# Altium PCB PCB_main_single_side_STACK.PcbDoc (part 1 of 2)
Units mm, origin at the board's own origin, x right, y up, seen from the top; angles counter-clockwise.
Board outline 58 x 37 mm, 2 copper layers (Top Layer, Bottom Layer), stack 1.571 mm thick; 67 components, 56 nets, 287 pads, 90 vias.
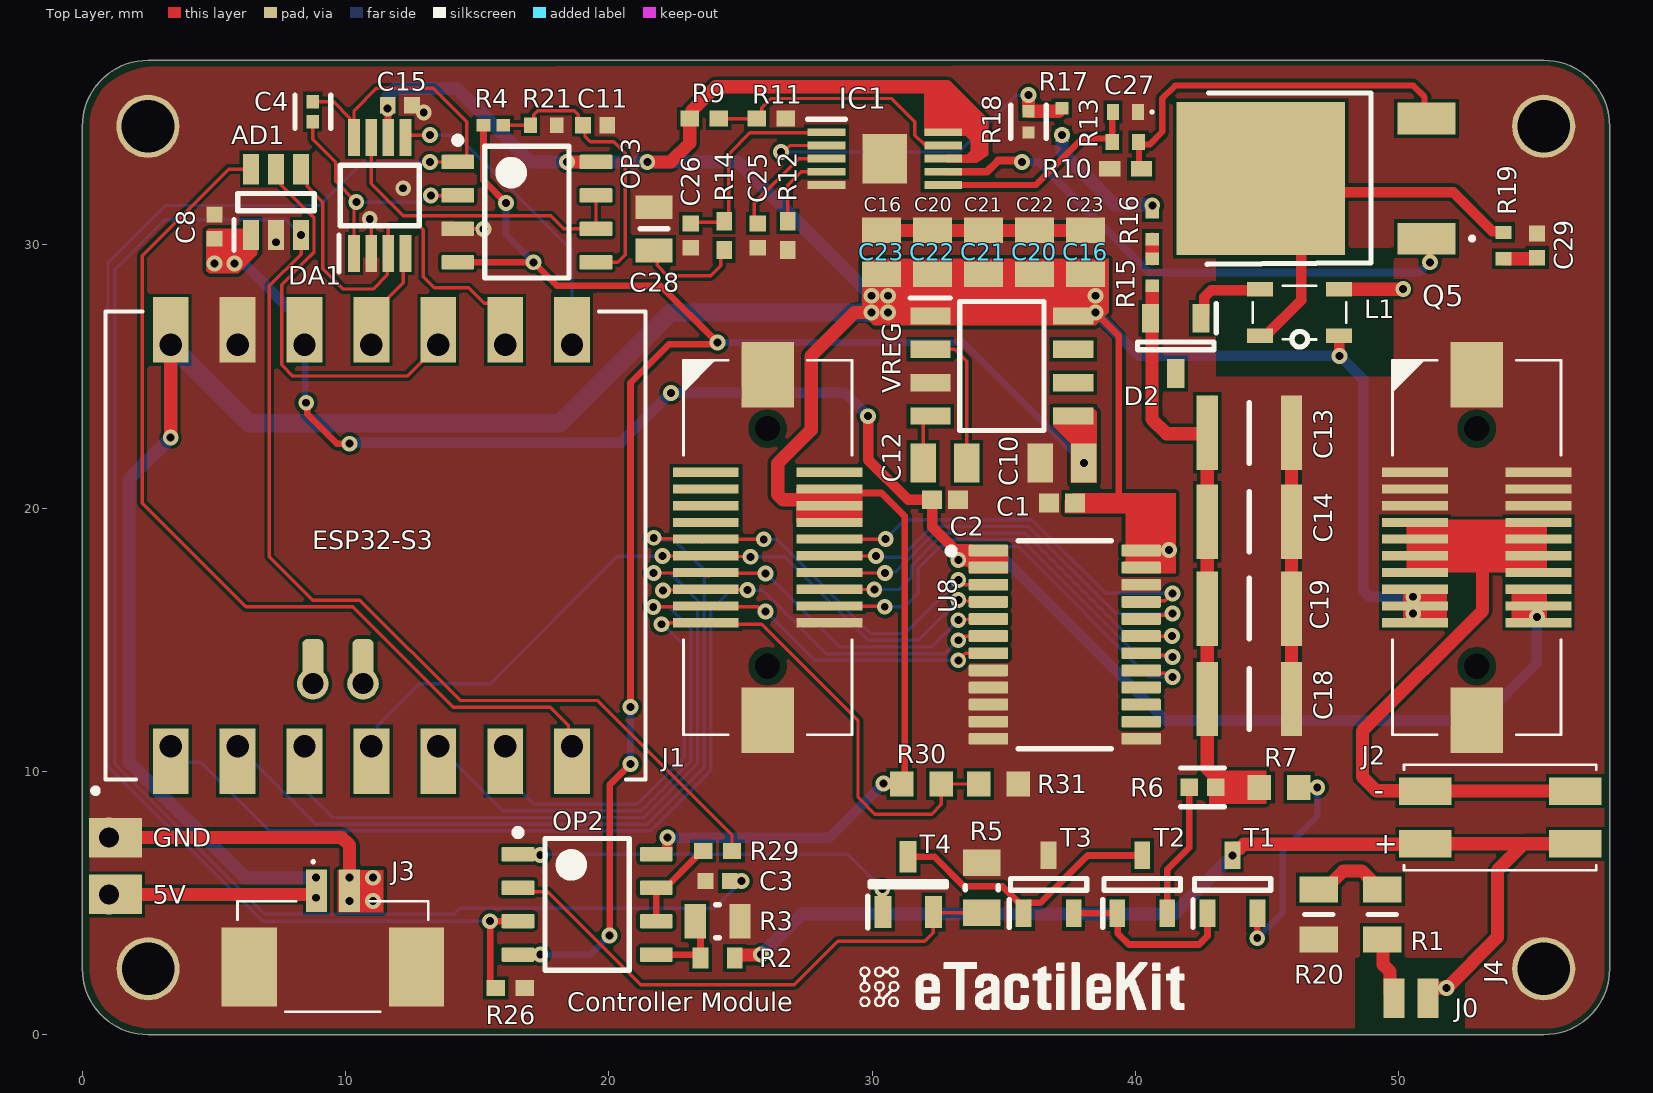
[diagram p0: Top Layer view]
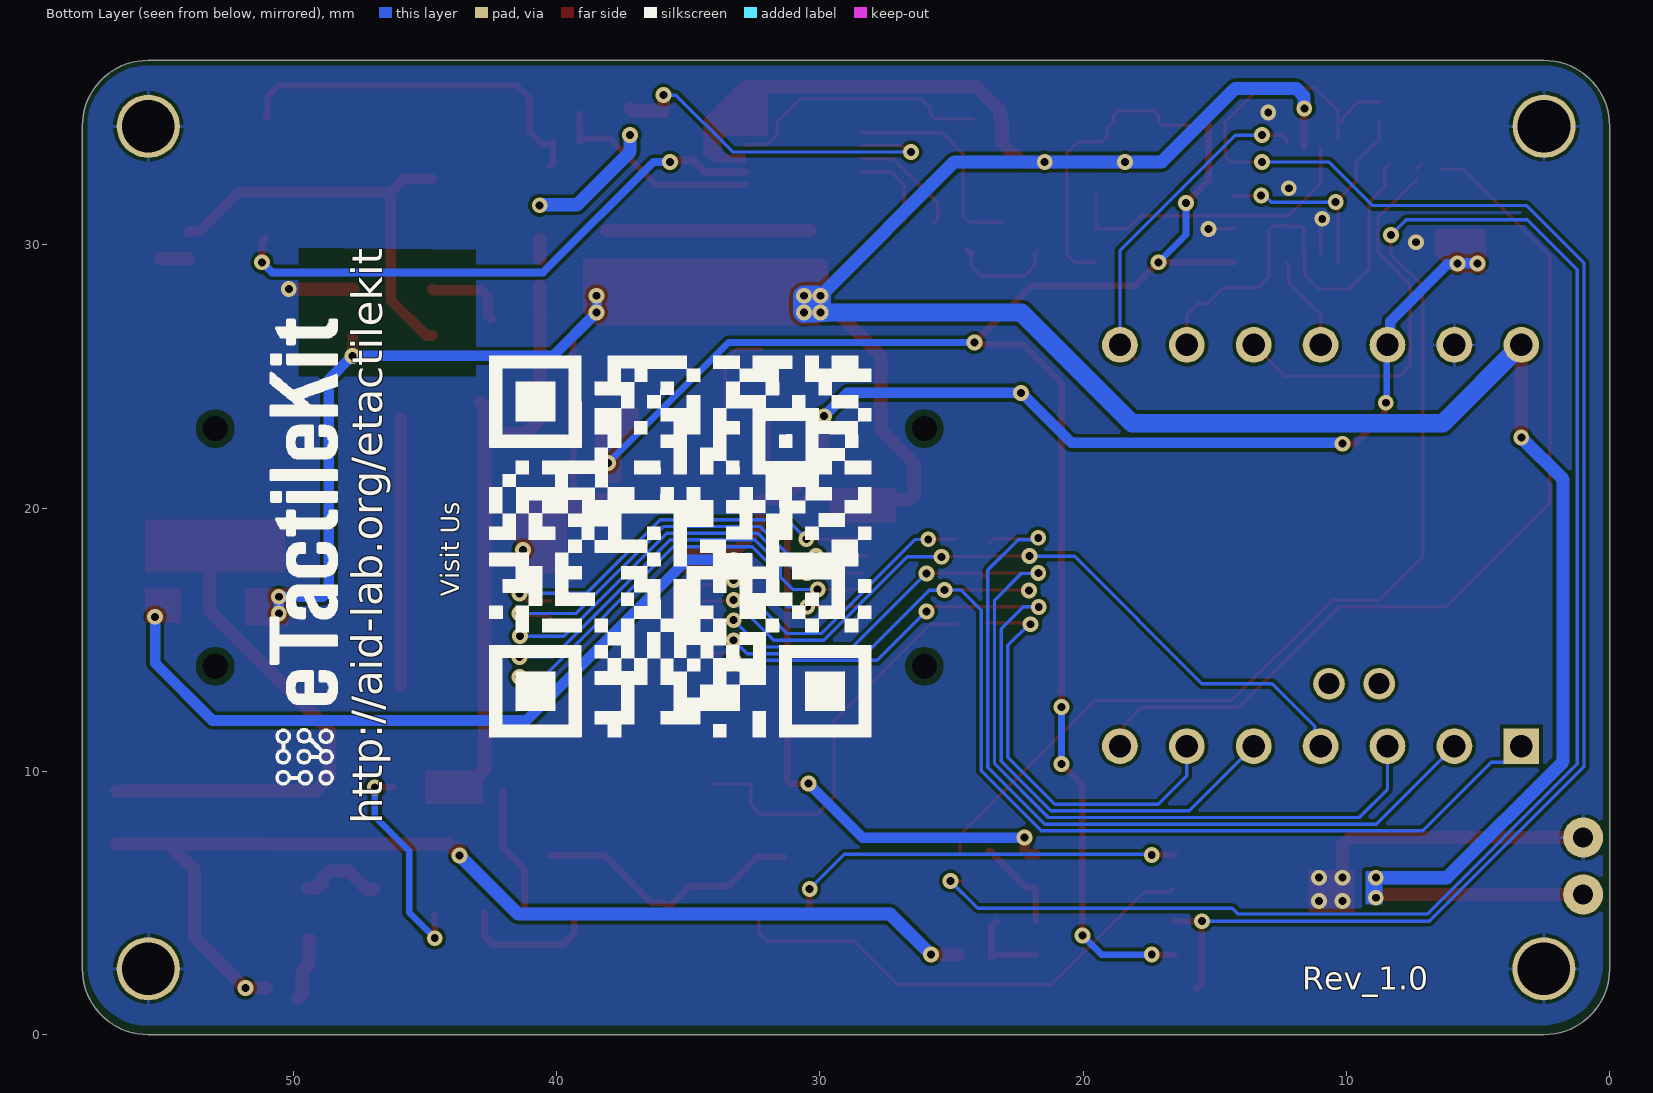
[diagram p1: Bottom Layer view, seen from below]

## Layer stack, top to bottom
Top Solder: solder mask 0.0102, Solder Resist, Dk 3.5
Top Layer: signal copper 0.0356
Dielectric 1: dielectric 1.5, FR-4, Dk 4.8
Bottom Layer: signal copper 0.0356
Bottom Solder: solder mask 0.0102, Solder Resist, Dk 3.5

## Board outline
0.008,2.508 0.008,34.508 cw(c2.508,34.508) 2.508,37.008 55.508,37.008 cw(c55.508,34.508) 58.008,34.508 58.008,2.508 cw(c55.508,2.508) 55.508,0.008 2.508,0.008 cw(c2.508,2.508)

## Design rules (kind name [scope] priority, off if disabled: settings)
BoardOutlineClearance [All] p1: gap=0.2 ignorepadtopadclearanceinfootprint=FALSE
Clearance [All] p1: gap=0.127 ignorepadtopadclearanceinfootprint=FALSE except(0.25: Arc-Hole Track-Hole SMDPad-Hole THPad-Hole Via-Hole Fill-Hole Poly-Hole Region-Hole Text-Hole)
ComponentClearance [All] p1: gap=0.127 collisioncheckmode=3 verticalgap=0.127 showdistances=TRUE
DiffPairsRouting [All] p1: maxlimit=0.254 minlimit=0.127 mostfreqgap=0.127 toplayer_minwidth=0.127 toplayer_maxwidth=25.4 toplayer_prefwidth=0.127 bottomlayer_minwidth=0.127 bottomlayer_maxwidth=25.4 bottomlayer_prefwidth=0.127 maxuncoupledlength=12.7
Height [All] p1: minheight=0 maxheight=1816.048 prefheight=12.7
HoleSize [All] p1: absolutevalues=TRUE maxlimit=6.3 minlimit=0.3 maxpercent=80.000 minpercent=20.000
HoleToHoleClearance [All] p1: gap=0.25 allowstackedmicrovias=FALSE
MinimumAnnularRing [All] p1: minimumring=0.076
MinimumSolderMaskSliver [All] p1: minsoldermaskwidth=0
PlaneClearance [All] p1: clearance=0.127
PlaneConnect PlaneConnectPowerPads [InPadClass('PowerPads')] p1: planeconnectstyle=Direct reliefexpansion=0.508 reliefentries=4 reliefconductorwidth=0.254 reliefairgap=0.254
PlaneConnect [All] p2: pad.planeconnectstyle=Relief pad.reliefexpansion=0.3 pad.reliefentries=4 pad.reliefconductorwidth=0.127 pad.reliefairgap=0.127 via.planeconnectstyle=Direct via.reliefexpansion=0.3 via.reliefentries=4 via.reliefconductorwidth=0.127 via.reliefairgap=0.127
PolygonConnect PolygonConnect_3 [All vs IsNamedPolygon('GND_L02_P007')] p1: connectstyle=Direct reliefconductorwidth=0.254 reliefentries=4 polygonreliefangle="90 Angle" airgapwidth=0.254
PolygonConnect PolygonConnect_2 [All vs IsNamedPolygon('GND_L02_P007')] p2: connectstyle=Direct reliefconductorwidth=0.254 reliefentries=4 polygonreliefangle="90 Angle" airgapwidth=0.254
PolygonConnect PolygonConnect_1 [All vs IsNamedPolygon('GND_L01_P000')] p3: connectstyle=Direct reliefconductorwidth=0.254 reliefentries=4 polygonreliefangle="90 Angle" airgapwidth=0.254
PolygonConnect PolygonConnectPowerPads [All vs (InPadClass('PowerPads'))] p4: connectstyle=Direct reliefconductorwidth=0.254 reliefentries=4 polygonreliefangle="90 Angle" airgapwidth=0.254
PolygonConnect [All] p5: thpad.connectstyle=Relief thpad.reliefconductorwidth=0.127 thpad.reliefentries=4 thpad.polygonreliefangle="90 Angle" thpad.airgapwidth=0.127 smdpad.connectstyle=Relief smdpad.reliefconductorwidth=0.127 smdpad.reliefentries=4 smdpad.polygonreliefangle="90 Angle" smdpad.airgapwidth=0.127 via.connectstyle=Direct via.reliefconductorwidth=0.127 via.reliefentries=4 via.polygonreliefangle="90 Angle" via.airgapwidth=0.127
RoutingVias [All] p1: holewidth=0.3 width=0.6 viastyle="Through Hole" minholewidth=0.3 minwidth=0.6 maxholewidth=0.6 maxwidth=6.6
SilkToSilkClearance [All] p1: silktosilkclearance=0
SilkToSolderMaskClearance [IsPad] p1: minsilkscreentomaskgap=0.127 clearancetoexposedcopper=TRUE
SolderMaskExpansion [All] p1: expansion=0.075 istentingtop=FALSE
SupplyNets "Schematic Supply Nets_4" [InNet('+5V')] p1: voltage=0.000
SupplyNets "Schematic Supply Nets_3" [InNet('-5')] p2: voltage=0.000
SupplyNets "Schematic Supply Nets_2" [InNet('+3V3')] p3: voltage=0.000
SupplyNets "Schematic Supply Nets" [InNet('GND')] p4: voltage=0.000
Width [All] p1: maxlimit=5 minlimit=0.127 preferedwidth=0.127 minimp=50.000000 maximp=50.000000 favimp=50.000000
20 further rules are at their usual default settings.

## Classes and differential pairs
component class vreg: C10 C12 C16 C20 C21 C22 C23 VREG
component class processor: C1 C2 ESP32-S3 J1 J2 J3 R30 R31 U8
component class DAC_ADC: AD1 C4 C8 C11 C15 DA1 OP3 R4 R21
component class current_mirror: C3 J0 J4 OP2 R1 R2 R3 R5 R6 R7 R20 R26 R29 T1 T2 T3 T4
component class boost_converter: C13 C14 C18 C19 C25 C26 C27 C28 C29 D2 IC1 L1 Q5 R9 R10 R11 R12 R13 R14 R15 R16 R17 R18 R19

## Components (designator, comment, footprint, x,y, rotation, side; value= is the part's Value field where it differs from the comment)
AD1 "AD7276AUJZ-REEL7" SOT95P280X100-6N 7.366,31.623 r90 top
C1 "CL05B104KO5NNNC" CAPC1050X55X23ML05T13 37.211,20.193 r180 top
C2 "CL05B104KO5NNNC" CAPC1050X55X23ML05T13 32.766,20.32 r180 top
C3 "GRM1555C1H102JA01D" CAPC1005X70N 24.13,5.842 r0 top
C4 "0402CG2R0C500NT" FP-GJM155-0_05-IPC_C 8.763,35.052 r270 top
C8 "CL05B104KO5NNNC" CAPC1005X55N 5.031,30.691 r270 top
C10 "GRM21BR61A476ME15L" CAPC2012X145N 37.211,21.717 r0 top
C11 "CL05B104KO5NNNC" CAPC1005X55N 19.479,34.544 r180 top
C12 "GRM21BR61A476ME15L" CAPC2012X145N 32.766,21.717 r0 top
C13 "C3225X7R2J683KT0L0U" CAPC3225X200N 44.323,22.86 r180 top
C14 "C3225X7R2J683KT0L0U" CAPC3225X200N 44.323,19.487 r180 top
C15 "CL05B104KO5NNNC" CAPC1005X55N 12.065,35.306 r180 top
C16 "GRM21BR61A476ME15L" CAPC2012X145N 38.1,29.718 r270 top
C18 "C3225X7R2J683KT0L0U" CAPC3225X200N 44.323,12.756 r180 top
C19 "C3225X7R2J683KT0L0U" CAPC3225X200N 44.323,16.185 r180 top
C20 "GRM21BR61A476ME15L" CAPC2012X145N 36.163,29.718 r270 top
C21 "GRM21BR61A476ME15L" CAPC2012X145N 34.227,29.718 r270 top
C22 "GRM21BR61A476ME15L" CAPC2012X145N 32.29,29.718 r270 top
C23 "GRM21BR61A476ME15L" CAPC2012X145N 30.353,29.718 r270 top
C25 "CL05B104KO5NNNC" CAPC1005X55N 25.654,30.353 r90 top
C26 "0402CG101J500NT" CAPC1005X55N 23.114,30.353 r90 top
C27 "GRM155R71H103KA88D" GRM15x 39.624,35.048 r180 top
C28 "CL21B223KBANNNC" CAPC2012X75N 21.717,30.607 r270 top
C29 "GRM1555C1H221JA01D" CAPC1005X70N 55.249,29.972 r270 top
D2 "LMBD3004SLT1G" SOT96P240X100-3N 41.529,26.162 r270 top
DA1 "AD5452YRMZ-REEL7" SOP65P490X110-8N 11.303,31.877 r90 top
ESP32-S3 "SEED XIAO ESP32-SE" PCBComponent_1 10.414,18.71 r90 top
IC1 "LT3757EMSE#TRPBF" SOP50P490X110-11N 30.48,33.274 r0 top
J0 "Saolder_bridge" "Solder Bridge" 50.516,1.397 r180 top
J1 "52885-0274" 528850274 26.035,18.508 r270 top
J2 "52885-0274" 528850274 52.959,18.508 r270 top
J3 "532610271" 532610271 9.525,3.175 r180 top
J4 "2307727-2" 2307727-2 53.848,8.255 r0 top
L1 "ATB322515" ATB322515 46.228,27.432 r0 top
OP2 "TL072IDR" D0008A_L 19.177,4.953 r0 top
OP3 "TL072IDR" D0008A_L 16.891,31.242 r0 top
Q5 "SQD40N06-14L_GE3" IPD25N06S4L30ATMA2 45.834,32.518 r90 top
R1 "0805W8F3302T5E" RESC2013X65N 49.373,4.572 r90 top
R2 "RC0603FR-071ML" RESC1608X55X25LL10T15 24.13,2.921 r0 top
R3 "CRCW08059K10FKEA" FP-CRCW0805-e3-IPC_C 24.13,4.318 r180 top
R4 "RC0402FR-0712KL" FP-RC0402-0_4-IPC_C 15.621,34.544 r180 top
R5 "CRCW08052K20FKEA" FP-CRCW0805-e3-IPC_B 34.163,5.588 r270 top
R6 "RMC1/16SK273FTH-M" FP-CRCW0402-e3-IPC_A 42.545,9.398 r0 top
R7 "0603WAF1001T5E" RESC1608X55N 45.454,9.398 r180 top
R9 "RK73H1ETTP1003F" RESC1005X40N 23.622,34.794 r180 top
R10 "WFCP0402R0200FE66" FP-PA0402-MFG 39.624,32.889 r0 top value=20mΩ
R11 "RK73H1ETTP4702F" RESC1005X40N 26.162,34.794 r180 top
R12 "RK73H1ETTP1303F" RESC1005X40N 26.797,30.353 r90 top
R13 "RC0402FR-0722RL" FP-RC0402-0_4-MFG 39.616,33.905 r180 top
R14 "RK73H1ETTP6801F" RESC1005X40N 24.384,30.353 r90 top
R15 "ERJU02F1004X" ERJS02_U02_(0402) 40.64,28.951 r270 top
R16 "ERJU02F1004X" ERJS02_U02_(0402) 40.64,30.734 r270 top
R17 "ERJU02F1004X" ERJS02_U02_(0402) 37.207,34.671 r270 top
R18 "CRCW040216K0FKED" FP-CRCW0402-e3-IPC_C 35.937,34.671 r90 top
R19 "RC0402FR-0722RL" FP-RC0402-0_4-MFG 53.979,29.972 r270 top
R20 "0805W8F3302T5E" RESC2013X65N 46.96,4.572 r270 top
R21 "HPCR0402F24K0K9" FP-RT0402-MFG 17.526,34.544 r180 top value=24KΩ
R26 "MCS04020C1002FE000" RESC1005X37N 16.256,1.778 r0 top
R29 "RK73H1ETTP1000F" RESC1005X40N 24.13,6.985 r0 top
R30 "RT0603BRD0740KL" RESC1608X55N 31.877,9.525 r180 top
R31 "0603WAF6042T5E" RESC1608X55N 34.798,9.525 r180 top
T1 "PBHV9050T-QR" SOT95P230X110-3N 43.688,5.715 r90 top
T2 "PBHV9050T-QR" SOT95P230X110-3N 40.259,5.715 r90 top
T3 "PBHV9050T-QR" SOT95P230X110-3N 36.703,5.715 r90 top
T4 "DMN60H080DS-13" SOT96P240X110-3N 31.369,5.715 r90 top
U8 "SN74LVC8T245PWR" FP-PW0024A-MFG 37.317,14.818 r0 top
VREG "LTC1144IS8#PBF" SOIC127P599X175-8N 34.925,25.4 r0 top

## Footprints (in the part's own frame and the unit in brackets; to place one, negate y for a bottom-side part, rotate by r counter-clockwise, add the part's x,y. Pads: shape width x height; smd on the part's side, far side on the other; paste and mask are expansions set on the pad)
2307727-2 [mm]
  rect 2x1.05 smd: 1(2.85,1) 2(2.85,-1) MP1(-2.85,1) MP2(-2.85,-1)
  silkscreen extent -3.65,-2 3.65,2, body extent -3.65,-2 3.65,2, height 2.07
528850274 [mm]
  rect 0.35x2.5 smd: 1(-2.857,-2.35) 2(-2.857,2.35) 3(-2.223,-2.35) 4(-2.223,2.35) 5(-1.587,-2.35) 6(-1.587,2.35) 7(-0.952,-2.35) 8(-0.952,2.35) 9(-0.317,-2.35) 10(-0.317,2.35) 11(0.317,-2.35) 12(0.317,2.35) 13(0.953,-2.35) 14(0.953,2.35) 15(1.588,-2.35) 16(1.588,2.35) 17(2.223,-2.35) 18(2.223,2.35) 19(2.857,-2.35) 20(2.857,2.35)
  rect 2.5x2 smd: 21(-6.56,0) 22(6.56,0)
  round 0.475 hole 0.95 unplated: 23(-4.51,0) 24(4.51,0)
  silkscreen extent -7.11,-3.2 7.11,3.2, body extent -7.11,-3.2 7.11,3.2, height 4.2
532610271 [mm]
  rect 0.8x1.6 smd: 1(0.625,-2.3) 2(-0.625,-2.3)
  rect 2.1x3 smd: MP1(3.175,0.6) MP2(-3.175,0.6)
  silkscreen extent -3.62,-3.45 3.62,2.3, body extent -3.83,-2.54 3.83,2.66, height 3.4
ATB322515 [mm]
  rect 1x0.55 smd: 1(-1.5,-0.875) 2(-1.5,0.875) 3(1.5,0.875) 4(1.5,-0.875)
  body extent -1.78,-1.02 1.78,1.02, height 1.21
CAPC1005X55N [mm]
  rect 0.6x0.62 smd: 1(-0.46,0) 2(0.46,0)
  body extent -0.5,-0.25 0.5,0.25, height 0.55
CAPC1005X70N [mm]
  rect 0.6x0.62 smd: 1(-0.46,0) 2(0.46,0)
  body extent -0.5,-0.25 0.5,0.25, height 0.5
CAPC1050X55X23ML05T13 [mm] "Chip Capacitor, 2-Leads, Body 1.05x0.55mm, IPC Low Density"
  rect 0.76x0.72 smd: 1(-0.49,0) 2(0.49,0)
  body extent -0.53,-0.28 0.53,0.27, height 0.55
CAPC2012X75N [mm]
  rect 0.91x1.39 smd: 1(-0.82,0) 2(0.82,0)
  silkscreen extent 0,-0.53 0,0.53, body extent -1,-0.63 1,0.63, height 0.75
CAPC2012X145N [mm]
  rect 0.97x1.47 smd: 1(-0.83,0) 2(0.83,0)
  body extent -1,-0.63 1,0.63, height 1.45
CAPC3225X200N [mm]
  rect 0.81x2.82 smd: 1(-1.6,0) 2(1.6,0)
  silkscreen extent 0,-1.15 0,1.15, body extent -1.6,-1.25 1.6,1.25, height 2.5
D0008A_L [mm] "SOIC, 8-Leads, Body 5x4mm, Pitch 1.27mm, IPC High Density"
  rrect18% 1.25x0.55 smd: 1(-2.625,1.905) 2(-2.625,0.635) 3(-2.625,-0.635) 4(-2.625,-1.905) 5(2.625,-1.905) 6(2.625,-0.635) 7(2.625,0.635) 8(2.625,1.905)
  silkscreen extent -2.75,-2.5 1.6,2.85, body extent -3,-2.45 3,2.45, height 1.63
ERJS02_U02_(0402) [mm]
  rect 0.475x0.5 smd: 1(-0.513,0) 2(0.513,0)
  body extent -0.5,-0.25 0.5,0.25, height 0.35
FP-CRCW0402-e3-IPC_A [mm]
  rect 0.668x0.672 smd paste+0 mask+0: 1(-0.502,0) 2(0.502,0)
  silkscreen extent -0.84,-0.74 0.84,0.74, body extent -1.04,-0.54 1.04,0.54, height 0.25
FP-CRCW0402-e3-IPC_C [mm]
  rect 0.468x0.472 smd paste+0 mask+0: 1(-0.402,0) 2(0.402,0)
  silkscreen extent -0.64,-0.67 0.64,0.67, body extent -0.5,-0.25 0.5,0.25, height 0.4
FP-CRCW0805-e3-IPC_B [mm]
  rect 1.007x1.408 smd paste+0 mask+0: 1(-0.951,0) 2(0.951,0)
  silkscreen extent -0.07,-0.63 0.07,0.63, body extent -1.7,-0.95 1.7,0.95, height 0.25
FP-CRCW0805-e3-IPC_C [mil]
  rect 31.75x51.5 smd paste+0 mask+0: 1(-33.5,0) 2(33.5,0)
  silkscreen extent -3,-25 3,25, body extent -53,-31 53,31, height 10
FP-GJM155-0_05-IPC_C [mm]
  rect 0.515x0.472 smd paste+0 mask+0: 1(-0.379,0) 2(0.379,0)
  silkscreen extent -0.64,-0.67 0.64,0.67, body extent -0.74,-0.38 0.74,0.38, height 0.25
FP-PA0402-MFG [mm]
  rect 0.8x0.6 smd paste+0 mask+0: 1(-0.6,0) 2(0.6,0)
  body extent -0.5,-0.28 0.5,0.28, height 0.4
FP-PW0024A-MFG [mm]
  rrect22% 1.5x0.45 smd paste+0 mask+0: 1(-2.9,3.575) 2(-2.9,2.925) 3(-2.9,2.275) 4(-2.9,1.625) 5(-2.9,0.975) 6(-2.9,0.325) 7(-2.9,-0.325) 8(-2.9,-0.975) 9(-2.9,-1.625) 10(-2.9,-2.275) 11(-2.9,-2.925) 12(-2.9,-3.575) 13(2.9,-3.575) 14(2.9,-2.925) 15(2.9,-2.275) 16(2.9,-1.625) 17(2.9,-0.975) 18(2.9,-0.325) 19(2.9,0.325) 20(2.9,0.975) 21(2.9,1.625) 22(2.9,2.275) 23(2.9,2.925) 24(2.9,3.575)
  silkscreen extent -4.44,-3.95 1.78,3.95, body extent -3.2,-3.9 3.2,3.9, height 1.2
FP-RC0402-0_4-IPC_C [mm]
  rect 0.515x0.472 smd paste+0 mask+0: 1(-0.379,0) 2(0.379,0)
  body extent -0.74,-0.38 0.74,0.38, height 0.25
FP-RC0402-0_4-MFG [mm]
  rect 0.5x0.6 smd: 1(-0.5,0) 2(0.5,0)
  body extent -0.5,-0.25 0.5,0.25, height 0.4
FP-RT0402-MFG [mm]
  rect 0.5x0.6 smd paste+0 mask+0: 1(-0.5,0) 2(0.5,0)
  body extent -0.85,-0.4 0.85,0.4, height 0.25
GRM15x [mm]
  rect 0.45x0.6 smd: 1(-0.475,0) 2(0.475,0)
  silkscreen extent -1.05,-0.05 -0.95,0.05, body extent -0.5,-0.28 0.5,0.27, height 0.5
IPD25N06S4L30ATMA2 [mm]
  rect 1.2x2.2 smd: 1(-2.28,-5.22) 3(2.28,-5.22)
  rect 5.8x6.4 smd: 2(0,1.08)
  silkscreen extent -3.25,-7 3.25,3.11, body extent -3.3,-5.87 3.3,3.83, height 2.4
PCBComponent_1 [mil]
  rect 98.43x53.46 smd: 1(-327.48,277.5) 2(-327.48,177.5) 3(-327.48,77.5) 4(-327.48,-22.5) 5(-327.48,-122.5) 6(-327.48,-222.5) 7(-327.48,-322.5) 8(317.48,-322.5) 9(317.48,-222.5) 10(317.48,-122.5) 11(317.48,-22.5) 12(317.48,77.5) 13(317.48,177.5) 14(317.48,277.5)
  rect 53.46x53.46 hole 33.46: 1(-305,277.5)
  round 53.46 hole 33.46: 2(-305,177.5) 3(-305,77.5) 4(-305,-22.5) 5(-305,-122.5) 6(-305,-222.5) 7(-305,-322.5) 8(295,-322.5) 9(295,-222.5) 10(295,-122.5) 11(295,-22.5) 12(295,77.5) 13(295,177.5) 14(295,277.5)
  rrect50% 70.87x31.5 smd: 15(-180,-10) 16(-180,65)
  silkscreen extent -376,-432 345,394, body extent -355,-434 345,450, height 166
RESC1005X37N [mm]
  rect 0.7x0.6 smd: 1(-0.55,0) 2(0.55,0)
  body extent -0.5,-0.25 0.5,0.25, height 0.32
RESC1005X40N [mm]
  rect 0.7x0.6 smd: 1(-0.55,0) 2(0.55,0)
  body extent -0.51,-0.25 0.51,0.25, height 0.4
RESC1608X55N [mm]
  rect 0.9x0.95 smd: 1(-0.75,0) 2(0.75,0)
  body extent -0.8,-0.4 0.8,0.4, height 0.55
RESC1608X55X25LL10T15 [mm] "Chip Resistor, 2-Leads, Body 1.70x0.90mm, IPC High Density"
  rect 0.6x0.8 smd: 1(-0.65,0) 2(0.65,0)
  body extent -0.85,-0.45 0.85,0.45, height 0.55
RESC2013X65N [mm]
  rect 1x1.45 smd: 1(-0.95,0) 2(0.95,0)
  silkscreen extent 0,-0.54 0,0.54, body extent -1,-0.64 1,0.64, height 0.65
SOIC127P599X175-8N [mm]
  rect 1.526x0.65 smd: 1(-2.712,1.905) 2(-2.712,0.635) 3(-2.712,-0.635) 4(-2.712,-1.905) 5(2.712,-1.905) 6(2.712,-0.635) 7(2.712,0.635) 8(2.712,1.905)
  silkscreen extent -3.47,-2.45 1.6,2.58, body extent -3,-2.45 3,2.45, height 1.75
"Solder Bridge" [mm]
  rect 0.8x1.5 smd: 1(-0.6,0) 2(0.7,0)
SOP50P490X110-11N [mm]
  rect 1.425x0.3 smd: 1(-2.212,1) 2(-2.212,0.5) 3(-2.212,0) 4(-2.212,-0.5) 5(-2.212,-1) 6(2.212,-1) 7(2.212,-0.5) 8(2.212,0) 9(2.212,0.5) 10(2.212,1)
  rect 1.68x1.88 smd: 11(0,0)
  silkscreen extent -2.93,1.5 -1.5,1.5, body extent -2.45,-1.5 2.45,1.5, height 1.1
SOP65P490X110-8N [mm]
  rect 1.4x0.45 smd: 1(-2.2,0.975) 2(-2.2,0.325) 3(-2.2,-0.325) 4(-2.2,-0.975) 5(2.2,-0.975) 6(2.2,-0.325) 7(2.2,0.325) 8(2.2,0.975)
  silkscreen extent -2.9,-1.5 1.15,1.55, body extent -2.45,-1.5 2.45,1.5, height 1.1
SOT95P230X110-3N [mm]
  rect 1.05x0.6 smd: 1(-1.1,0.95) 2(-1.1,-0.95) 3(1.1,0)
  silkscreen extent -1.63,-1.45 0.23,1.5, body extent -1.2,-1.45 1.2,1.45, height 0.95
SOT95P280X100-6N [mm]
  rect 1.15x0.6 smd: 1(-1.25,0.95) 2(-1.25,0) 3(-1.25,-0.95) 4(1.25,-0.95) 5(1.25,0) 6(1.25,0.95)
  silkscreen extent -1.83,-1.45 0.33,1.6, body extent -1.4,-1.45 1.4,1.45, height 1
SOT96P240X100-3N [mm]
  rect 1.1x0.65 smd: 1(-1.05,0.96) 2(-1.05,-0.96) 3(1.05,0)
  silkscreen extent -1.6,-1.45 0.15,1.54, body extent -1.2,-1.45 1.2,1.45, height 1
SOT96P240X110-3N [mm]
  rect 1.2x0.65 smd: 1(-1.05,0.96) 2(-1.05,-0.96) 3(1.05,0)
  silkscreen extent -1.65,-1.45 0.1,1.54, body extent -1.33,-1.5 1.33,1.5, height 1.1

## Part data
AD1: "Integrated Circuit", Manufacturer_Name="Analog Devices", Mouser Part Number=584-AD7276AUJZ-R7, Arrow Part Number=AD7276AUJZ-REEL7, Arrow Price/Stock=https://www.arrow.com/en/products/ad7276aujz-reel7/analog-devices, Datasheet Link=http://componentsearchengine.com/Datasheets/1/AD7276AUJZ-REEL7.pdf, Height=1mm, Manufacturer_Part_Number=AD7276AUJZ-REEL7, Mouser Price/Stock=https://www.mouser.co.uk/ProductDetail/Analog-Devices/AD7276AUJZ-REEL7?qs=NmRFExCfTkGcJMyUALbIIQ%3D%3D
C1 C2: library part CMP-2000-05439-1, "Chip Capacitor, 100 nF, +/- 10%, 16 V, -55 to 125 degC, 0402 (1005 Metric), RoHS, Tape and Reel", Capacitance=100000pF, Case Size/Dimension=0402, Dielectric=X7R, Manufacturer="Samsung Electro-Mechanics", Rated Voltage=16V, Tolerance (%)=±10%, Datasheet URL=https://datasheet.ciiva.com/29198/458718-da-01-en-vs-kondensator-0402-29198423.pdf, Datasheet Version=Nov-10, Manufacturer URL=http://www.samsungsem.com/global/index.jsp
C3: library part GRM1552C1H102JA01D, "1nF 50V 5% C0G 0402 ceramic capacitor", LCSC Part Number=C76947, Manufacturer_Name="Murata Electronics", Mouser Part Number=N/A, Datasheet Link=https://datasheet.lcsc.com/datasheet/pdf/dcf17139cd724f8e8706553836b517d8.pdf?productCode=C76947, Height=0.55mm, Manufacturer_Part_Number=GRM1555C1H102JA01D
C4: library part CMP-2008-03830-2, "Multi-Layer Ceramic Capacitor 2pF C0G  ±0.1pF 0402 Paper T/R", Capacitance=2pF, Case Code (Imperial)=0402, Case Code (Metric)=1005, Dielectric=C0G, Max Operating Temperature=125°C, Min Operating Temperature=-55°C, Package Quantity=1, Voltage Rating=50V, Case/Package=0402, Depth=0.5mm, Height=0.5mm, Lead Free="Lead Free", Lead Pitch=0.3mm, Length=1mm, Mount="Surface Mount", Number of Pins=2, Packaging="Tape and Reel", Radiation Hardening=No, REACH SVHC="No SVHC", Termination=SMD/SMT, Thickness=0.022inch, Voltage Rating (DC)=50V, Width=0.5mm
C8 C11 C15 C25: "Capacitor", Manufacturer_Name=SAMSUNG, Mouser Part Number=187-CL05B104KO5NNNC, Arrow Part Number=CL05B104KO5NNNC, Arrow Price/Stock=https://www.arrow.com/en/products/cl05b104ko5nnnc/samsung-electro-mechanics?utm_currency=USD&region=europe, Datasheet Link=https://datasheet.datasheetarchive.com/originals/distributors/Datasheets-DGA10/2408147.pdf, Height=0.55mm, Manufacturer_Part_Number=CL05B104KO5NNNC, Mouser Price/Stock=https://www.mouser.co.uk/ProductDetail/Samsung-Electro-Mechanics/CL05B104KO5NNNC?qs=hqM3L16%252BxlfT2SKOuAUq6Q%3D%3D
C10 C12 C16 C20 C21 C22 C23: "Capacitor", Manufacturer_Name="Murata Electronics", Mouser Part Number=81-GRM21BR61A476ME5L, Arrow Part Number=GRM21BR61A476ME15L, Arrow Price/Stock=https://www.arrow.com/en/products/grm21br61a476me15l/murata-manufacturing?utm_currency=USD&region=nac, Datasheet Link=https://search.murata.co.jp/Ceramy/image/img/A01X/G101/ENG/GRM21BR61A476ME15-01A.pdf, Height=1.45mm, Manufacturer_Part_Number=GRM21BR61A476ME15L, Mouser Price/Stock=https://www.mouser.co.uk/ProductDetail/Murata-Electronics/GRM21BR61A476ME15L?qs=hNud%2FORuBR2%2FEB7WUpdltg%3D%3D
C13 C14 C18 C19: library part C3225X7R2J683K200AA, "Capacitor", Manufacturer_Name=TDK, Mouser Part Number=810-C3225X7R2J683K, Arrow Part Number=C3225X7R2J683K200AA, Arrow Price/Stock=https://www.arrow.com/en/products/c3225x7r2j683k200aa/tdk?region=nac, Datasheet Link=https://product.tdk.com/info/en/catalog/datasheets/mlcc_commercial_midvoltage_en.pdf, Height=2mm, Manufacturer_Part_Number=C3225X7R2J683K200AA, Mouser Price/Stock=https://www.mouser.com/Search/Refine.aspx?Keyword=810-C3225X7R2J683K
C26: "Capacitor", Manufacturer_Name="Guangdong Fenghua Advanced Tech", Datasheet Link=https://datasheet.lcsc.com/szlcsc/Guangdong-Fenghua-Advanced-Tech-0402CG101J500NT_C1546.pdf, Height=0.55mm, Manufacturer_Part_Number=0402CG101J500NT
C27: "Capacitor", Manufacturer_Name="Murata Electronics", Mouser Part Number=81-GRM155R71H103KA8D, Arrow Part Number=GRM155R71H103KA88D, Arrow Price/Stock=https://www.arrow.com/en/products/grm155r71h103ka88d/murata-manufacturing?utm_currency=USD&region=nac, Datasheet Link=https://search.murata.co.jp/Ceramy/image/img/A01X/G101/ENG/GRM155R71H103KA88-01A.pdf, Height=0.33mm, Manufacturer_Part_Number=GRM155R71H103KA88D, Mouser Price/Stock=https://www.mouser.co.uk/ProductDetail/Murata-Electronics/GRM155R71H103KA88D?qs=Dfh4SrgScWxOVlCuzd3ZyQ%3D%3D
C28: "Capacitor", Manufacturer_Name=SAMSUNG, Mouser Part Number=187-CL21B223KBANNNC, Arrow Part Number=CL21B223KBANNNC, Arrow Price/Stock=https://www.arrow.com/en/products/cl21b223kbannnc/samsung-electro-mechanics?utm_currency=USD&region=europe, Datasheet Link=https://datasheet.datasheetarchive.com/originals/distributors/Datasheets_SAMA/f1186cf82a02fbe5c02a084f1b7bc7a5.pdf, Height=0.75mm, Manufacturer_Part_Number=CL21B223KBANNNC, Mouser Price/Stock=https://www.mouser.co.uk/ProductDetail/Samsung-Electro-Mechanics/CL21B223KBANNNC?qs=349EhDEZ59o8NyW%2FjkRQDg%3D%3D
C29: "Capacitor", Manufacturer_Name="Murata Electronics", Mouser Part Number=81-GRM1555C1H221JA01, Arrow Part Number=GRM1555C1H221JA01D, Arrow Price/Stock=https://www.arrow.com/en/products/grm1555c1h221ja01d/murata-manufacturing, Datasheet Link=https://search.murata.co.jp/Ceramy/image/img/A01X/G101/ENG/GRM1555C1H221JA01-01A.pdf, Height=0.7mm, Manufacturer_Part_Number=GRM1555C1H221JA01D, Mouser Price/Stock=https://www.mouser.co.uk/ProductDetail/Murata-Electronics/GRM1555C1H221JA01D?qs=AflYu6BMgmkFaPorbrBIOQ%3D%3D
D2: library part MMBD3004S-7-F, "Diode", Arrow Part Number=N/A, LCSC Part Number=C2912025, Manufacturer_Name=LRC, Datasheet Link=https://datasheet.lcsc.com/datasheet/pdf/fb38fe26aa71a7d6338775a41d6a7480.pdf?productCode=C2912025, Height=1mm, JLCPCB URL=https://jlcpcb.com/partdetail/LRC-LMBD3004SLT1G/C2912025, Manufacturer_Part_Number=LMBD3004SLT1G
DA1: "Integrated Circuit", Manufacturer_Name="Analog Devices", Mouser Part Number=584-AD5452YRMZ-R7, Arrow Part Number=AD5452YRMZ-REEL7, Arrow Price/Stock=https://www.arrow.com/en/products/ad5452yrmz-reel7/analog-devices?region=nac, Datasheet Link=https://componentsearchengine.com/Datasheets/1/AD5452YRMZ-REEL7.pdf, Height=1.1mm, Manufacturer_Part_Number=AD5452YRMZ-REEL7, Mouser Price/Stock=https://www.mouser.co.uk/ProductDetail/Analog-Devices/AD5452YRMZ-REEL7?qs=NmRFExCfTkHoityukWLALQ%3D%3D
ESP32-S3 J0: library part Component_1
IC1: library part LT3757EMSETRPBF, "Integrated Circuit", Manufacturer_Name="Analog Devices", Height=1.1mm, Manufacturer_Part_Number=LT3757EMSETRPBF
J1 J2: "Connector", Manufacturer_Name=Molex, Mouser Part Number=538-52885-0274, Datasheet Link=https://www.molex.com/webdocs/datasheets/pdf/en-us/0528850274_PCB_RECEPTACLES.pdf, Height=4mm, Manufacturer_Part_Number=52885-0274, Mouser Price/Stock=https://www.mouser.co.uk/ProductDetail/Molex/52885-0274?qs=%252BPJ3Ll1xQNYiQig4hWY5jQ%3D%3D
J3: library part 53261-0271, "C177225", Manufacturer_Name=Molex, Mouser Part Number=538-53261-0271, Arrow Part Number=53261-0271, Arrow Price/Stock=https://www.arrow.com/en/products/53261-0271/molex?region=nac, Datasheet Link=https://www.molex.com/pdm_docs/sd/532610271_sd.pdf, Height=3.65mm, Manufacturer_Part_Number=53261-0271, Mouser Price/Stock=https://www.mouser.co.uk/ProductDetail/Molex/53261-0271?qs=%252B72YyncTwW%252B8%252BBjraxGf3A%3D%3D
J4: "Connector"
OP2 OP3: library part CMP-0015-00084-2, "Dual Low-Noise JFET-Input General-Purpose Operational Amplifier, 7 to 36 V, -40 to 85 degC, 8-pin SOIC (D8), Green (RoHS & no Sb/Br)", Manufacturer="Texas Instruments", Rating=Catalog, Total Supply Voltage(Max)(+5V is 5, +/-5V is 10)=36, Total Supply Voltage(Min)(+5V is 5, +/-5V is 10)=7, CMRR(Min)(dB)=75, Code_JEDEC=MS-012, ComponentLink1Description="Manufacturer URL", ComponentLink1URL=http://www.ti.com/, ComponentLink2Description=Datasheet, ComponentLink2URL=http://www.ti.com/lit/ds/symlink/tl072.pdf, ComponentLink3Description="Package Specification", ComponentLink3URL=http://www.ti.com/litv/pdf/msoi002j, DatasheetVersion=SLOS080J, Eco-Plan="Green (RoHS & no Sb/Br)", GBW(Typ)(MHz)=3, IIB(Max)(pA)=200, Iq per channel(Max)(mA)=2.5, Mounting Technology="Surface Mount", Number of Channels=2, Offset Drift(Typ)(uV/C)=18, PackageDescription="8-Pin Plastic Small Outline, Body 4.9 x 3.9 mm, Pitch 1.27 mm", PackageReference=D0008A, PackageVersion="4040047-3/M, 06/2011", PartNumber=TL072IDR, Slew Rate(Typ)(V/us)=13, Sub Family="General Purpose Amplifier, High Supply Voltage Amplifier (>=30V)", Vio (25C)(Max)(mV)=6, Vn at 1kHz(Typ)(nV/rtHz)=18
Q5: library part IPD25N06S4L30ATMA2, "60V 40A N-channel MOSFET, 17mOhm max at VGS=4.5V, TO-252", Arrow Part Number=N/A, LCSC Part Number=C3291003, Manufacturer_Name="Vishay Siliconix", Datasheet Link=https://www.vishay.com/docs/67002/sqd40n06-14l.pdf, Height=2.38mm, JLCPCB URL=https://jlcpcb.com/partdetail/VishayIntertech-SQD40N0614L_GE3/C3291003, Manufacturer_Part_Number=SQD40N06-14L_GE3
R1 R7 R20: "Resistor", Manufacturer_Name="UNI-ROYAL(Uniroyal Elec)"
  R1 R20: Datasheet Link=https://datasheet.lcsc.com/lcsc/2110251830_UNI-ROYAL-Uniroyal-Elec-0805W8F3302T5E_C17633.pdf, Height=0.65mm, Manufacturer_Part_Number=0805W8F3302T5E
  R7: Datasheet Link=https://datasheet.lcsc.com/szlcsc/Uniroyal-Elec-0603WAF1001T5E_C21190.pdf, Height=0.55mm, Manufacturer_Part_Number=0603WAF1001T5E
R2: library part CMP-1659-00056-1, "Chip Resistor, 1 MOhm, +/- 1%, 100 mW, -55 to 155 degC, 0603 (1608 Metric), RoHS, Tape and Reel", Capacitance="1 mF", Case\Package=Radial, Max Operating Temperature="85 degC", Min Operating Temperature="-40 degC", Package Quantity=200, Tolerance=20%, Voltage Rating="25 V", ComponentLink1Description="Manufacturer URL", ComponentLink1URL=http://www.yageo.com/, ComponentLink2Description=Datasheet, ComponentLink2URL=http://www.yageo.com/documents/recent/PYu-RC_Group_51_RoHS_L_04.pdf, DatasheetVersion="Rev. 4, 02/2016", Diameter="10 mm", Height="20 mm", Lead Pitch="5 mm", Length="20 mm", Mount="Through Hole", PackageDescription="2-Pin Surface Mount Device, Body 1.6 x 0.8 mm", PackageReference=0603, Packaging=Bulk, Radiation Hardening=No, REACH SVHC="No SVHC", RoHSCompliant=true, Voltage Rating (DC)="25 V", Width="0 inch"
R3: library part CMP-2001-04176-2, "RES Thick Film, 9.1kΩ, 1%, 0.125W, 100ppm/°C, 0805", Case Code (Imperial)=0805, Case Code (Metric)=2012, Max Operating Temperature=155°C, Max Power Dissipation=125mW, Min Operating Temperature=-55°C, Package Quantity=10, Resistance=9.1kR, Temperature Coefficient=100ppm/°C, Tolerance=1%, Voltage Rating=150V, Case/Package=0805, Composition="Thick Film", Contact Plating=Tin, Depth=1.25mm, Features="Automotive AEC-Q200", Height=0.45mm, Lead Free="Lead Free", Length=2mm, Military Standard=Not, Number of Terminations=2, Packaging="Tape and Reel", Power Rating=125mW, Radiation Hardening=No, Termination=SMD/SMT, Voltage Rating (DC)=150V, Weight=0.000194oz, Width=0.049inch
R4: library part CMP-2002-07378-2, "RES SMD 12K OHM 1% 1/16W 0402", Case Code (Imperial)=0402, Case Code (Metric)=1005, Max Operating Temperature=155°C, Max Power Dissipation=63mW, Min Operating Temperature=-55°C, Package Quantity=1, Power Rating=62.5mW, Resistance=12kR, Resistance Tolerance=1%, Resistor Type="Thick Film", Temperature Coefficient=100ppm/°C, Voltage Rating=50V, Case/Package=0402, Construction=Rectangular, Depth=0.5mm, Features="Moisture Resistant", Height=0.016inch, Lead Free="Lead Free", Length=1mm, Military Standard=Not, Number of Terminations=2, Packaging="Tape and Reel", REACH SVHC="No SVHC", RoHS Compliant=Yes, Series=RC, Size Code=0402, Termination=SMD/SMT, Tolerance=1%, Weight=2.3E-05oz, Width=0.02inch
R5: library part CMP-2001-03760-2, "RES Thick Film, 2.2kΩ, 1%, 0.125W, 100ppm/°C, 0805", Case Code (Imperial)=0805, Case Code (Metric)=2012, Max Operating Temperature=155°C, Max Power Dissipation=125mW, Min Operating Temperature=-55°C, Package Quantity=10, Resistance=2.2kR, Temperature Coefficient=100ppm/°C, Tolerance=1%, Voltage Rating=150V, Case/Package=0805, Composition="Thick Film", Contact Plating=Tin, Depth=1.25mm, Features="Automotive AEC-Q200", Height=0.45mm, Lead Free="Lead Free", Length=2mm, Military Standard=Not, Number of Terminations=2, Packaging="Tape and Reel", Power Rating=125mW, Radiation Hardening=No, Termination=SMD/SMT, Voltage Rating (DC)=150V, Weight=0.000194oz, Width=1.25mm
R6: library part CMP-2002-08431-2, "RES Thick Film, 27kΩ, 1%, 0.063W, 100ppm/°C, 0402", Case Code (Imperial)=0402, Case Code (Metric)=1005, Max Operating Temperature=155°C, Max Power Dissipation=63mW, Min Operating Temperature=-55°C, Package Quantity=10, Resistance=27kR, Temperature Coefficient=100ppm/°C, Tolerance=1%, Voltage Rating=50V, Case/Package=0402, Composition="Thick Film", Contact Plating=Tin, Depth=0.5mm, Features="Automotive AEC-Q200", Height=0.35mm, Lead Free="Lead Free", Length=1mm, Military Standard=Not, Mount="Surface Mount", Number of Pins=2, Number of Terminations=2, Packaging="Tape and Reel", Power Rating=63mW, Radiation Hardening=No, Termination=SMD/SMT, Voltage Rating (DC)=50V, Weight=2.3E-05oz, Width=0.02inch
R9: "Resistor", Manufacturer_Name="KOA Speer", Mouser Part Number=660-RK73H1ETTP1003F, Arrow Part Number=RK73H1ETTP1003F, Arrow Price/Stock=https://www.arrow.com/en/products/rk73h1ettp1003f/koa-speer-electronics?region=nac, Datasheet Link=http://www.koaspeer.com/catimages/Products/RK73-RT/RK73-RT.pdf, Height=0.4mm, Manufacturer_Part_Number=RK73H1ETTP1003F, Mouser Price/Stock=https://www.mouser.co.uk/ProductDetail/KOA-Speer/RK73H1ETTP1003F?qs=b1MjUb3%252BcaVl%2FZYcKgjmuQ%3D%3D
R10: library part CMP-03412-023933-1, "20mOhm 1% 0.25W 0402 metal foil current-sense resistor", LCSC Part Number=C4295137, Manufacturer="Vishay Dale", Package=0402, Power Rating=0.25W, Resistance=20mΩ, Temperature="-55°C to +170°C", Temperature Coefficient=100ppm/°C, Temperature Range High=+170°C, Temperature Range Low=-55°C, Tolerance=1%, Automotive=No, Category=Res, ComponentLink2Description=Datasheet, ComponentLink2URL=https://www.vishay.com/docs/30417/wfcp.pdf, Composition="Metal Foil", Device Class L1="Passive Components", Device Class L2=Resistors, Device Class L3="Chip SMD Resistors", Digikey Description="20mOhm 1% 0.25W 0402 metal foil current-sense resistor", Height=0.55mm, Ipc Land Pattern Name=RESC10055X40, JLCPCB URL=https://jlcpcb.com/partdetail/VishayIntertech-WFCP0402R0200FE66/C4295137, Lead Free=Yes, Manufacturer Part Number=WFCP0402R0200FE66, RoHS=TRUE, Series=WFCP0402
R11: "Resistor", Manufacturer_Name="KOA Speer", Mouser Part Number=660-RK73H1ETTP4702F, Arrow Part Number=RK73H1ETTP4702F, Arrow Price/Stock=https://www.arrow.com/en/products/rk73h1ettp4702f/koa-speer-electronics, Datasheet Link=http://www.koaspeer.com/catimages/Products/RK73-RT/RK73-RT.pdf, Height=0.4mm, Manufacturer_Part_Number=RK73H1ETTP4702F, Mouser Price/Stock=https://www.mouser.co.uk/ProductDetail/KOA-Speer/RK73H1ETTP4702F?qs=VhCg8p3QXBbdph5DclKeLw%3D%3D
R12: "Resistor", Manufacturer_Name="KOA Speer", Mouser Part Number=660-RK73H1ETTP1303F, Datasheet Link=http://www.koaspeer.com/catimages/Products/RK73-RT/RK73-RT.pdf, Height=0.4mm, Manufacturer_Part_Number=RK73H1ETTP1303F, Mouser Price/Stock=https://www.mouser.co.uk/ProductDetail/KOA-Speer/RK73H1ETTP1303F?qs=nWTjSGqwIiQKngPNRzbM%2FA%3D%3D
R13 R19: library part CMP-2002-07520-2, Case Code (Imperial)=0402, Max Operating Temperature=155°C, Min Operating Temperature=-55°C, Power Rating=63mW, Resistance=22Ω, Temperature Coefficient=100ppm/°C, Tolerance=1%, Voltage Rating=50V, Case/Package=0402, Composition="Thick Film", Depth=500µm, Height=400µm, Lead Free="Lead Free", Length=1mm, Military Standard=Not, Number of Pins=2, Packaging="Tape & Reel", REACH SVHC=Unknown, RoHS=Compliant, Schedule B="8533210045, 8533210045", Termination=SMD/SMT, Voltage Rating (AC)=50V, Voltage Rating (DC)=50V, Width=500µm
R14: "Resistor", Manufacturer_Name="KOA Speer", Mouser Part Number=660-RK73H1ETTP6801F, Arrow Part Number=RK73H1ETTP6801F, Arrow Price/Stock=https://www.arrow.com/en/products/rk73h1ettp6801f/koa-speer-electronics, Datasheet Link=http://www.koaspeer.com/catimages/Products/RK73-RT/RK73-RT.pdf, Height=0.4mm, Manufacturer_Part_Number=RK73H1ETTP6801F, Mouser Price/Stock=https://www.mouser.com/Search/Refine.aspx?Keyword=660-RK73H1ETTP6801F
R15 R16 R17: "Resistor", Manufacturer_Name=Panasonic, Datasheet Link=https://industrial.panasonic.com/cdbs/www-data/pdf/RDP0000/AOA0000C334.pdf, Height=0.4mm, Manufacturer_Part_Number=ERJU02F1004X
R18: library part CMP-1011-00644-3, "RES Thick Film, 16kΩ, 1%, 0.063W, 100ppm/°C, 0402", Case Code (Imperial)=0402, Case Code (Metric)=1005, Max Operating Temperature=155°C, Max Power Dissipation=63mW, Min Operating Temperature=-55°C, Package Quantity=10, Resistance=16kR, Temperature Coefficient=100ppm/°C, Tolerance=1%, Voltage Rating=50V, Case/Package=0402, Composition="Thick Film", Contact Plating=Tin, Depth=0.5mm, Features="Automotive AEC-Q200", Height=0.35mm, Lead Free="Lead Free", Length=1mm, Military Standard=Not, Mount="Surface Mount", Number of Pins=2, Number of Terminations=2, Packaging="Tape and Reel", Power Rating=63mW, Radiation Hardening=No, Termination=SMD/SMT, Voltage Rating (DC)=50V, Weight=2.3E-05oz, Width=0.02inch
R21: library part CMP-03412-008661-1, "24kOhm 1% 0.1W 0402 thick film resistor", LCSC Part Number=C364976, Manufacturer=RESI, Package=0402, Power Rating=0.1W, Resistance=24KΩ, Temperature="-55°C to +125°C", Temperature Coefficient=100ppm/°C, Temperature Range High=+125°C, Temperature Range Low=-55°C, Tolerance=0.01, Voltage Rating=50V, Automotive=No, Category=Res, ComponentLink2Description="LCSC Product", ComponentLink2URL=https://www.lcsc.com/product-detail/C364976.html, Composition="Thick Film", Device Class L1="Passive Components", Device Class L2=Resistors, Device Class L3="Chip SMD Resistors", Digikey Description="24kOhm 1% 0.1W 0402 thick film resistor", Footprint Url=http://www.yageo.com/exep/pages/download/literatures/PYu-R_Mount_10.pdf, Height=0.35mm, Ipc Land Pattern Name=RESC10050X30, Lead Free=Yes, Manufacturer Part Number=HPCR0402F24K0K9, RoHS=TRUE, Series=HPCR
R26: "Resistor", Manufacturer_Name=Vishay, Mouser Part Number=594-MCS04020C1002FE0, Arrow Part Number=MCS04020C1002FE000, Arrow Price/Stock=https://www.arrow.com/en/products/mcs04020c1002fe000/vishay?utm_currency=USD&region=nac, Datasheet Link=http://www.vishay.com/docs/28705/mcx0x0xpro.pdf, Height=0.37mm, Manufacturer_Part_Number=MCS04020C1002FE000, Mouser Price/Stock=https://www.mouser.co.uk/ProductDetail/Vishay-Beyschlag/MCS04020C1002FE000?qs=7ZE6F4QMOBZ3EZwk%252BYP9Dg%3D%3D
R29: "Resistor", Manufacturer_Name="KOA Speer", Mouser Part Number=660-RK73H1ETTP1000F, Arrow Part Number=RK73H1ETTP1000F, Arrow Price/Stock=https://www.arrow.com/en/products/rk73h1ettp1000f/koa-speer-electronics?region=nac, Datasheet Link=http://www.koaspeer.com/catimages/Products/RK73-RT/RK73-RT.pdf, Height=0.4mm, Manufacturer_Part_Number=RK73H1ETTP1000F, Mouser Price/Stock=https://www.mouser.co.uk/ProductDetail/KOA-Speer/RK73H1ETTP1000F?qs=VhCg8p3QXBZstDOVIJ3D7A%3D%3D
R30: "Resistor", Manufacturer_Name=YAGEO, Mouser Part Number=603-RT0603BRD0740KL, Arrow Part Number=RT0603BRD0740KL, Arrow Price/Stock=https://www.arrow.com/en/products/rt0603brd0740kl/yageo?region=nac, Datasheet Link=https://www.yageo.com/upload/media/product/app/datasheet/rchip/pyu-rt_1-to-0.01_rohs_l.pdf, Height=0.55mm, Manufacturer_Part_Number=RT0603BRD0740KL, Mouser Price/Stock=https://www.mouser.co.uk/ProductDetail/YAGEO/RT0603BRD0740KL?qs=gt1LBUVyoHlX7zH8R4KgIw%3D%3D
R31: library part MCT06030C6042FP500, "Resistor", Manufacturer_Name=Vishay, Datasheet Link=http://www.vishay.com/docs/28705/mcx0x0xpro.pdf, Height=0.55mm, Manufacturer_Part_Number=0603WAF6042T5E, Mouser Part Number=0603WAF6042T5E
T1 T2 T3: library part PBHV9040TVL, "Transistor BJT PNP", LCSC Part Number=C7508533, Manufacturer_Name=Nexperia, Mouser Part Number=771-PBHV9050T-QR, Datasheet Link=https://assets.nexperia.com/documents/data-sheet/PBHV9050T-Q.pdf, Height=1.1mm, Manufacturer_Part_Number=PBHV9050T-QR, Mouser Price/Stock=https://eu.mouser.com/ProductDetail/Nexperia/PBHV9050T-QR?qs=MyNHzdoqoQKsO%2FBO4TGLSQ%3D%3D
T4: "MOSFET (N-Channel)", Manufacturer_Name="Diodes Incorporated", Mouser Part Number=621-DMN60H080DS-13, Arrow Part Number=DMN60H080DS-13, Arrow Price/Stock=https://www.arrow.com/en/products/dmn60h080ds-13/diodes-incorporated, Datasheet Link=https://www.diodes.com//assets/Datasheets/DMN60H080DS.pdf, Height=1.1mm, Manufacturer_Part_Number=DMN60H080DS-13, Mouser Price/Stock=https://www.mouser.co.uk/ProductDetail/Diodes-Incorporated/DMN60H080DS-13?qs=HXFqYaX1Q2wO6tm1AgR7Fw%3D%3D
U8: library part CMP-04899-000027-1, "IC TRNSLTR BIDIRECTIONAL 24TSSOP", Ambient Temperature Range High=+85°C, Ambient Temperature Range Low=-40°C, Manufacturer="Texas Instruments", Max Supply Voltage=5.5V, Min Supply Voltage=1.65V, Nominal Supply Current=25uA, Package=PW0024A, Temperature="-40°C to +85°C", Automotive=No, Category=IC, ComponentLink2Description=Datasheet, ComponentLink2URL=http://www.ti.com/lit/ds/symlink/sn74lvc8t245.pdf, Device Class L1="Integrated Circuits (ICs)", Device Class L2="Logic ICs", Device Class L3="Voltage Level Shifters", Digikey Description="IC TRNSLTR BIDIRECTIONAL 24TSSOP", Height=1.2mm, Ipc Land Pattern Name=SOP65P640X120-24, Lead Free=Yes, Logic Function Desc=Non-Inverting, Manufacturer Part Number=SN74LVC8T245PWR, Mouser Description="Translation - Voltage Levels 8-Bit Dual-Supply Bus Xcvr", Number Of Circuits=1, Number Of Inputs=8, Number Of Outputs=8, Octopart=https://octopart.com/sn74lvc8t245pwr-texas+instruments-517164, Propagation Delay=4.3ns, RoHS=TRUE, Standoff Height=0.05mm, Temperature Range High=+85°C, Temperature Range Low=-40°C, V A Max=5.5V, V A Min=1.65V, V B Max=5.5V, V B Min=1.65V
VREG: "Integrated Circuit", Manufacturer_Name="Analog Devices", Mouser Part Number=584-LTC1144IS8#PBF, Arrow Part Number=LTC1144IS8#PBF, Arrow Price/Stock=https://www.arrow.com/en/products/ltc1144is8pbf/analog-devices?utm_currency=USD&region=europe, Datasheet Link=http://cds.linear.com/docs/en/datasheet/1144fa.pdf, Height=1.752mm, Manufacturer_Part_Number=LTC1144IS8#PBF, Mouser Price/Stock=https://www.mouser.co.uk/ProductDetail/Analog-Devices/LTC1144IS8PBF?qs=hVkxg5c3xu%2FkbkSDzzDboA%3D%3D

## Free pads (board coordinates)
  round 2.4 hole 2: 2(55.5,2.508) 3(55.5,34.5) 4(2.5,34.5) 5(2.508,2.508)
  rect 2x1.5 smd: 8(1.27,5.334) 8(1.27,7.493)
  round 1.524 hole 0.762: 9(1.016,7.493) 10(1.016,5.334)
  round 1.2 hole 0.8: 11(8.763,13.335) 12(10.668,13.335)

## Via types
v1: diameter 0.6, hole 0.3, Top Layer to Bottom Layer, tented both sides, 90 vias

## Nets (pads, with @x,y where several pads share a name; then routed paths per layer and width w, separated by ;. In a path a pad name is that pad's centre, name@x,y a point inside that pad or via, vN(x,y) a via of type N, cw(c..) or ccw(c..) an arc to the next point about the centre after c; other vN are vias at no path point)
+3V3: AD1.1 C2.2 C8.2 ESP32-S3.12 J2.16 J2.18 J2.20 U8.1 U8.2 | length 65.5
  Top Layer w0.254: v1(8.509,24.003) 8.546,23.966 8.546,23.585 9.682,22.449 v1(10.16,22.449) ; U8.2@34.407,17.753 U8.2@34.417,17.763
  Top Layer w0.4: v1(29.845,23.495) 29.845,21.844 31.369,20.32 C2.2 32.276,19.286 33.128,18.434 U8.1@33.78,18.434
  Bottom Layer w0.254: ESP32-S3.12@8.445,26.203 8.477,26.171 8.477,24.035 v1(8.509,24.003)
  Bottom Layer w0.4: v1(5.031,29.294) v1(5.793,29.294) 5.831,29.256 6.177,29.256 8.333,27.1 8.333,26.315 ESP32-S3.12@8.445,26.203 ; v1(10.16,22.449) 10.19,22.479 20.447,22.479 22.341,24.373 v1(22.363,24.373) ; v1@22.363,24.384 28.956,24.384 v1(29.845,23.495) ; v1(33.274,18.034) 35.052,18.034 41.148,11.938 53.064,11.938 55.245,14.119 v1(55.245,15.875)
+5V: C1.1 C15.2 C16.2 C20.2 C21.2 C22.2 C23.2 DA1.6 ESP32-S3.14 IC1.8 IC1.10 J1.4 J1.6 J1.8 J2.15 J2.17 J2.19 J3.1 L1.4 OP2.8 OP3.8 pad.8@1.27,5.334 pad.10 R9.2 R30.2 U8.23 U8.24 VREG.1 VREG.8 | length 178.6
  Top Layer w0.254: v1(11.605,35.179) 11.617,35.167 11.617,33.707 DA1.6@11.628,33.696 ; J1.4@28.385,20.575 30.352,20.575 31.242,19.685 31.242,9.64 R30.2 31.11,9.541 v1(30.427,9.541) ; v1(38.481,27.432) 39.37,26.543 39.37,20.32 v1(41.275,18.415)
  Top Layer w0.4: OP2.8 22.077,6.858 22.225,7.006 v1(22.225,7.493) ; L1.4 47.74,26.545 47.74,25.793 v1(47.752,25.781)
  Top Layer w0.5: pad.10 8.763,5.334 v1(8.89,5.207) ; v1(3.364,22.679) v1(3.364,22.679) ESP32-S3.14@3.365,26.203 ; v1(18.415,33.147) OP3.8 ; v1(21.463,33.147) 22.352,33.147 23.072,33.867 R9.2 ; R9.2@23.172,34.844 23.172,35.11 24.062,36 32.834,36 34.163,34.671 34.163,34.294 ; 27.615,20.45 27.485,20.32 26.615,20.32 26.416,20.519 26.416,21.703 27.686,22.973 27.686,25.781 29.337,27.432 v1(29.972,27.432) ; C23.2 C22.2 C21.2 C20.2 C16.2
  Bottom Layer w0.4: v1(22.225,7.493) 28.379,7.493 v1(30.427,9.541) ; v1(38.481,28.067) v1(38.481,27.432) 40.132,25.781 v1(47.752,25.781) 48.641,24.892 48.641,16.871 48.875,16.637 v1(50.546,16.637) v1(50.546,16.002)
  Bottom Layer w0.5: v1(3.364,22.679) 1.778,21.093 1.778,10.38 6.189,5.969 v1(8.89,5.969) ; v1(11.605,35.179) 11.621,35.195 11.621,35.648 11.914,35.941 14.224,35.941 17.018,33.147 v1(18.415,33.147) v1(21.463,33.147) 24.892,33.147 v1(29.972,28.067)
  Bottom Layer w0.7: ESP32-S3.14@3.365,26.203 6.343,23.226 18.146,23.226 22.352,27.432 v1(29.972,27.432)
  other v1: 30.607,27.432 30.607,28.067
+300V: C13.2 C14.2 C18.2 C19.2 D2.2 R6.2 R7.2 R15.2 | length 22.8
  Top Layer w0.5: R15.2 40.64,27.283 D2.2 40.626,27.155 40.626,23.382 41.179,22.829 42.723,22.829 C14.2 ; C18.2 42.723,10.109 43.714,9.118 ; C18.2@42.723,12.808 42.723,16.133 42.775,16.185 42.723,16.237 42.723,19.435 C14.2@42.775,19.487 ; C13.2 42.723,23.865 C13.2@42.878,24.02
-5: C10.2 OP2.4 OP3.4 R4.2 VREG.5 | length 64
  Top Layer w0.254: OP3.4 v1(17.145,29.337) 18.034,28.448 21.971,28.448 v1(24.13,26.289) 24.066,26.226 22.288,26.226 20.828,24.765 v1(20.828,12.446) ; R4.2 15.242,32.451 v1(16.1,31.594) ; OP2.4 v1(17.399,3.048) ; v1(20.032,3.776) 20.032,9.491 v1(20.828,10.287) ; VREG.5 37.843,23.495 38.041,23.297 v1(38.041,21.717)
  Bottom Layer w0.254: v1(16.1,31.594) 16.1,30.382 v1(17.145,29.337) ; v1(17.399,3.048) 19.304,3.048 v1(20.032,3.776) ; v1(20.828,10.287) v1(20.828,12.446) ; v1(24.13,26.289) 33.469,26.289 v1(38.041,21.717)
AD_CS: AD1.6 ESP32-S3.7 | length 35.4
  Top Layer w0.127: AD1.6 5.568,32.873 2.286,29.591 2.286,20.193 6.223,16.256 10.287,16.256 14.097,12.446 17.78,12.446 18.468,11.758 18.468,11.101 ESP32-S3.7@18.605,10.963
AD_MISO: AD1.5 ESP32-S3.10 | length 15.1
  Top Layer w0.127: AD1.5@7.153,33.086 AD1.5 ; AD1.5@7.301,32.533 8.084,31.749 8.807,31.027 8.807,29.719 8.424,29.337 7.576,28.489 7.576,25.445 8.002,25.019 12.341,25.019 ESP32-S3.10@13.525,26.203
ADIN: AD1.3 C3.2 R29.2 | length 89.2
  Top Layer w0.127: v1(8.316,30.373) 8.316,29.652 7.112,28.448 7.112,18.161 8.763,16.51 10.541,16.51 14.351,12.7 19.558,12.7 24.68,7.578 R29.2 ; C3.2 v1(25.04,5.842)
  Bottom Layer w0.127: v1(8.316,30.373) 7.741,30.948 3.135,30.948 1.237,29.05 1.237,10.298 6.946,4.59 14.115,4.59 14.333,4.808 24.007,4.808 v1(25.04,5.842)
BAT+: ESP32-S3.15 pad.12
BAT-: ESP32-S3.16 pad.11
BL: J1.16 U8.18 | length 17.2
  Top Layer w0.127: J1.16@28.385,16.856 28.442,16.912 v1(30.084,16.912) ; U8.18@40.238,14.534 40.35,14.422 41.331,14.422 v1(41.402,14.351)
  Bottom Layer w0.127: v1(30.084,16.912) 31.009,16.912 31.496,17.399 31.496,17.824 32.468,18.796 35.687,18.796 40.132,14.351 v1(41.402,14.351)
CLK: J1.12 U8.20 | length 16.3
  Top Layer w0.127: J1.12@28.244,18.139 28.289,18.184 v1(30.143,18.185) v1(30.143,18.185) ; U8.20@40.238,15.834 40.335,15.931 41.331,15.931 v1(41.402,16.002)
  Bottom Layer w0.127: v1(30.143,18.185) 30.184,18.143 31.097,18.143 32.258,19.304 35.941,19.304 39.243,16.002 v1(41.402,16.002)
DA_CS: DA1.5 ESP32-S3.8 | length 12.7
  Top Layer w0.127: DA1.5@12.278,33.874 12.278,34.006 12.44,34.168 v1(13.213,34.168) ; ESP32-S3.8@17.994,25.64 18.557,26.203 ESP32-S3.8@18.605,26.203
  Bottom Layer w0.127: v1(13.213,34.168) 14.219,34.168 18.578,29.809 ; ESP32-S3.8@18.605,26.203 18.605,29.781
DA_MOSI: DA1.4 ESP32-S3.11 | length 3.1
  Top Layer w0.127: ESP32-S3.11@10.986,26.774 10.986,27.345 12.192,28.551 12.192,29.21 DA1.4@12.278,29.296
DIN: J1.18 U8.17 | length 17.7
  Top Layer w0.127: J1.18@28.575,16.271 30.465,16.271 v1(30.48,16.256) ; U8.17@40.238,13.884 40.389,13.733 41.157,13.733 41.301,13.589 v1(41.402,13.589)
  Bottom Layer w0.127: v1(30.48,16.256) 31.242,16.256 31.75,16.764 31.75,17.718 32.574,18.542 35.56,18.542 40.513,13.589 v1(41.402,13.589)
FB: IC1.2 R17.1 R18.2 | length 14.2
  Top Layer w0.127: v1(26.543,33.528) 26.644,33.528 26.89,33.774 IC1.2@28.395,33.774
  Top Layer w0.5: v1(35.941,35.687) 35.935,35.681 R18.2 37.095,35.071 R17.1
  Bottom Layer w0.127: v1(26.543,33.528) 33.31,33.528 35.469,35.687 v1(35.941,35.687)
GATE: IC1.7 Q5.1 | length 21.4
  Top Layer w0.3: IC1.7@32.819,32.774 34.364,32.774 34.787,33.197 35.637,33.197 v1(35.687,33.147) ; Q5.1 51.181,30.111 v1(51.181,29.337)
  Bottom Layer w0.3: v1(35.687,33.147) 36.322,33.147 40.513,28.956 50.8,28.956 v1(51.181,29.337)
GND: AD1.2 C1.2 C2.1 C3.1 C8.1 C10.1 C11.1 C13.1 C14.1 C15.1 C16.1 C18.1 C19.1 C20.1 C21.1 C22.1 C23.1 C25.1 C26.1 C27.1 C28.1 C29.1 DA1.2 ESP32-S3.13 IC1.5 IC1.11 J1.20 J1.21 J1.22 J2.1 J2.2 J2.3 J2.4 J2.5 J2.6 J2.21 J2.22 J3.2 J3.MP1 J3.MP2 L1.3 OP3.3 pad.2 pad.3 pad.4 pad.5 pad.8@1.27,7.493 pad.9 R3.1 R5.1 R10.1 R11.1 R12.1 R18.1 R20.2 R21.1 R26.2 R31.1 T3.3 U8.8 U8.9 U8.10 U8.11 U8.12 U8.13 U8.22 VREG.3 | length 33.1
  Top Layer w0.127: v1(10.922,30.988) 10.978,30.988 DA1.2 ; OP3.3 v1(15.24,30.607)
  Top Layer w0.5: pad.9 9.867,7.493 10.16,7.2 v1(10.16,5.969) ; C23.1 C16.1 ; C18.1@45.923,13.264 C13.1@45.923,23.368 ; L1.3 47.735,28.314 50.158,28.314 v1(50.165,28.321)
  other v1: 10.16,5.08 11.049,5.08 11.049,5.969 7.366,30.099 12.192,32.149 12.975,35.027
HVL_BL: ESP32-S3.1 J1.15 U8.6 | length 44.2
  Top Layer w0.127: v1(22.061,16.877) 22.079,16.894 23.667,16.894 J1.15@23.685,16.912 ; J1.15@23.756,16.892 23.766,16.902 25.263,16.902 v1(25.273,16.892) ; v1(33.274,14.986) 33.364,14.986 33.521,15.143 U8.6
  Bottom Layer w0.127: ESP32-S3.1@3.365,10.963 3.981,10.348 4.514,10.348 7.114,7.747 21.59,7.747 23.876,10.033 23.876,16.129 24.639,16.892 v1(25.273,16.892) 25.284,16.881 25.85,16.881 28.253,14.478 32.766,14.478 v1(33.274,14.986)
HVL_CLK: ESP32-S3.4 J1.11 U8.4 | length 28.7
  Top Layer w0.127: v1(22.038,18.183) 23.685,18.183 23.7,18.168 25.367,18.168 v1(25.382,18.153) ; v1(33.274,16.51) 33.308,16.476 34.383,16.476 U8.4
  Bottom Layer w0.127: ESP32-S3.4@10.986,10.963 11.208,11.186 11.208,11.716 12.827,13.335 15.494,13.335 20.33,18.171 22.025,18.171 v1(22.038,18.183) ; v1(25.382,18.153) 26.678,18.153 29.845,14.986 31.75,14.986 v1(33.274,16.51)
HVL_DIOB: ESP32-S3.5 J1.17 U8.7 | length 31.9
  Top Layer w0.127: v1(21.689,16.252) 25.657,16.252 25.829,16.08 v1(25.957,16.08) ; v1(33.274,14.224) 33.543,14.493 U8.7
  Bottom Layer w0.127: ESP32-S3.5@13.525,10.963 15.98,8.509 21.231,8.509 23.114,10.392 23.114,15.416 22.277,16.252 v1(21.689,16.252) ; v1(25.957,16.08) 27.813,14.224 v1(33.274,14.224)
HVL_LE: ESP32-S3.2 J1.9 U8.3 | length 43.6
  Top Layer w0.127: v1(21.708,18.875) 21.737,18.846 23.416,18.846 J1.9@23.557,18.705 ; J1.9@24.848,18.835 24.865,18.818 v1@25.886,18.818 ; v1(33.274,17.272) 33.342,17.272 33.521,17.093 U8.3
  Bottom Layer w0.127: ESP32-S3.2@5.905,10.963 8.868,8.001 21.463,8.001 23.622,10.16 23.622,17.653 22.468,18.807 21.777,18.807 v1(21.708,18.875) ; v1(25.887,18.818) 25.892,18.813 26.377,18.813 29.95,15.24 31.242,15.24 v1(33.274,17.272)
HVL_POL: ESP32-S3.3 J1.13 U8.5 | length 40.5
  Top Layer w0.127: v1(21.705,17.537) 21.71,17.542 23.68,17.542 J1.13@23.685,17.547 ; J1.13@23.685,17.441 23.809,17.441 23.903,17.535 25.945,17.535 v1(25.957,17.524) ; v1(33.274,15.748) 33.296,15.77 34.395,15.77 U8.5
  Bottom Layer w0.127: ESP32-S3.3@8.445,10.963 8.445,9.335 9.525,8.255 21.336,8.255 23.368,10.287 23.368,16.51 22.358,17.52 21.722,17.52 v1(21.705,17.537) ; v1(25.957,17.524) 28.748,14.732 32.258,14.732 v1(33.274,15.748)
IOUT: C4.2 DA1.1 OP3.2 | length 10.1
  Top Layer w0.127: C4.2 8.763,34.001 9.63,33.134 9.63,32.407 v1(10.414,31.623) 10.328,31.537 DA1.1@10.328,29.296 ; v1(13.243,31.87) 14.259,31.87 OP3.2
  Bottom Layer w0.127: v1(10.414,31.623) 12.868,31.623 13.115,31.87 v1(13.243,31.87)
J4_2: J0.1 J4.2 J4.MP2 R2.2 T1.3 | length 41.3
  Top Layer w0.5: R2.2@24.73,3.029 25.762,3.029 v1(25.781,3.048) ; v1(43.688,6.815) 43.688,7.04 43.738,7.09 43.963,7.09 44.112,7.239 50.982,7.239 J4.MP2 J4.2 ; J0.1@51.019,1.778 v1(51.816,1.778) 53.744,3.706 53.744,6.246 54.753,7.255
  Bottom Layer w0.5: v1(25.781,3.048) 27.321,4.588 41.461,4.588 v1(43.688,6.815)
LE: J1.10 U8.21 | length 15.8
  Top Layer w0.127: J1.10@28.385,18.817 28.394,18.826 30.505,18.826 v1(30.514,18.836) ; U8.21@40.238,16.484 41.122,16.484 v1(41.402,16.764)
  Bottom Layer w0.127: v1(30.514,18.836) 31.236,19.558 36.068,19.558 38.862,16.764 v1(41.402,16.764)
NetC11_2: C11.2 OP3.5 R4.1 R21.2 | length 11.1
  Top Layer w0.127: R4.1 R21.2 17.149,34.667 17.149,34.949 17.298,35.098 18.697,35.098 18.846,34.949 18.846,34.717 19.095,34.468 19.095,34.118 19.304,33.909 20.193,33.909 20.62,33.482 20.62,29.624 20.333,29.337 OP3.5
NetC12_1: C12.1 VREG.4 | length 1.9
  Top Layer w0.127: C12.1 31.936,23.233 32.197,23.495 VREG.4
NetC12_2: C12.2 VREG.2 | length 5.4
  Top Layer w0.127: VREG.2 33.147,26.035 33.596,25.586 C12.2
NetC25_2: C25.2 IC1.3 | length 4.4
  Top Layer w0.127: C25.2 25.527,30.94 25.527,31.589 27.212,33.274 IC1.3@28.395,33.274
NetC26_2: C26.2 IC1.1 R14.2 | length 8.1
  Top Layer w0.127: C26.2 23.159,30.858 24.339,30.858 R14.2 24.555,31.074 24.555,33.445 25.361,34.251 28.372,34.251 IC1.1@28.395,34.274
NetC28_2: C28.2 R14.1 | length 4